# Altium PCB Sampler.PCBDOC (part 3 of 7)
Units mil, origin at the board's own origin, x right, y up, seen from the top; angles counter-clockwise.
Board outline 6299 x 3937 mil, 4 copper layers (Top, GP1(GND), L3, Bot), stack 64.883 mil thick; 567 components, 323 nets, 1698 pads, 817 vias.
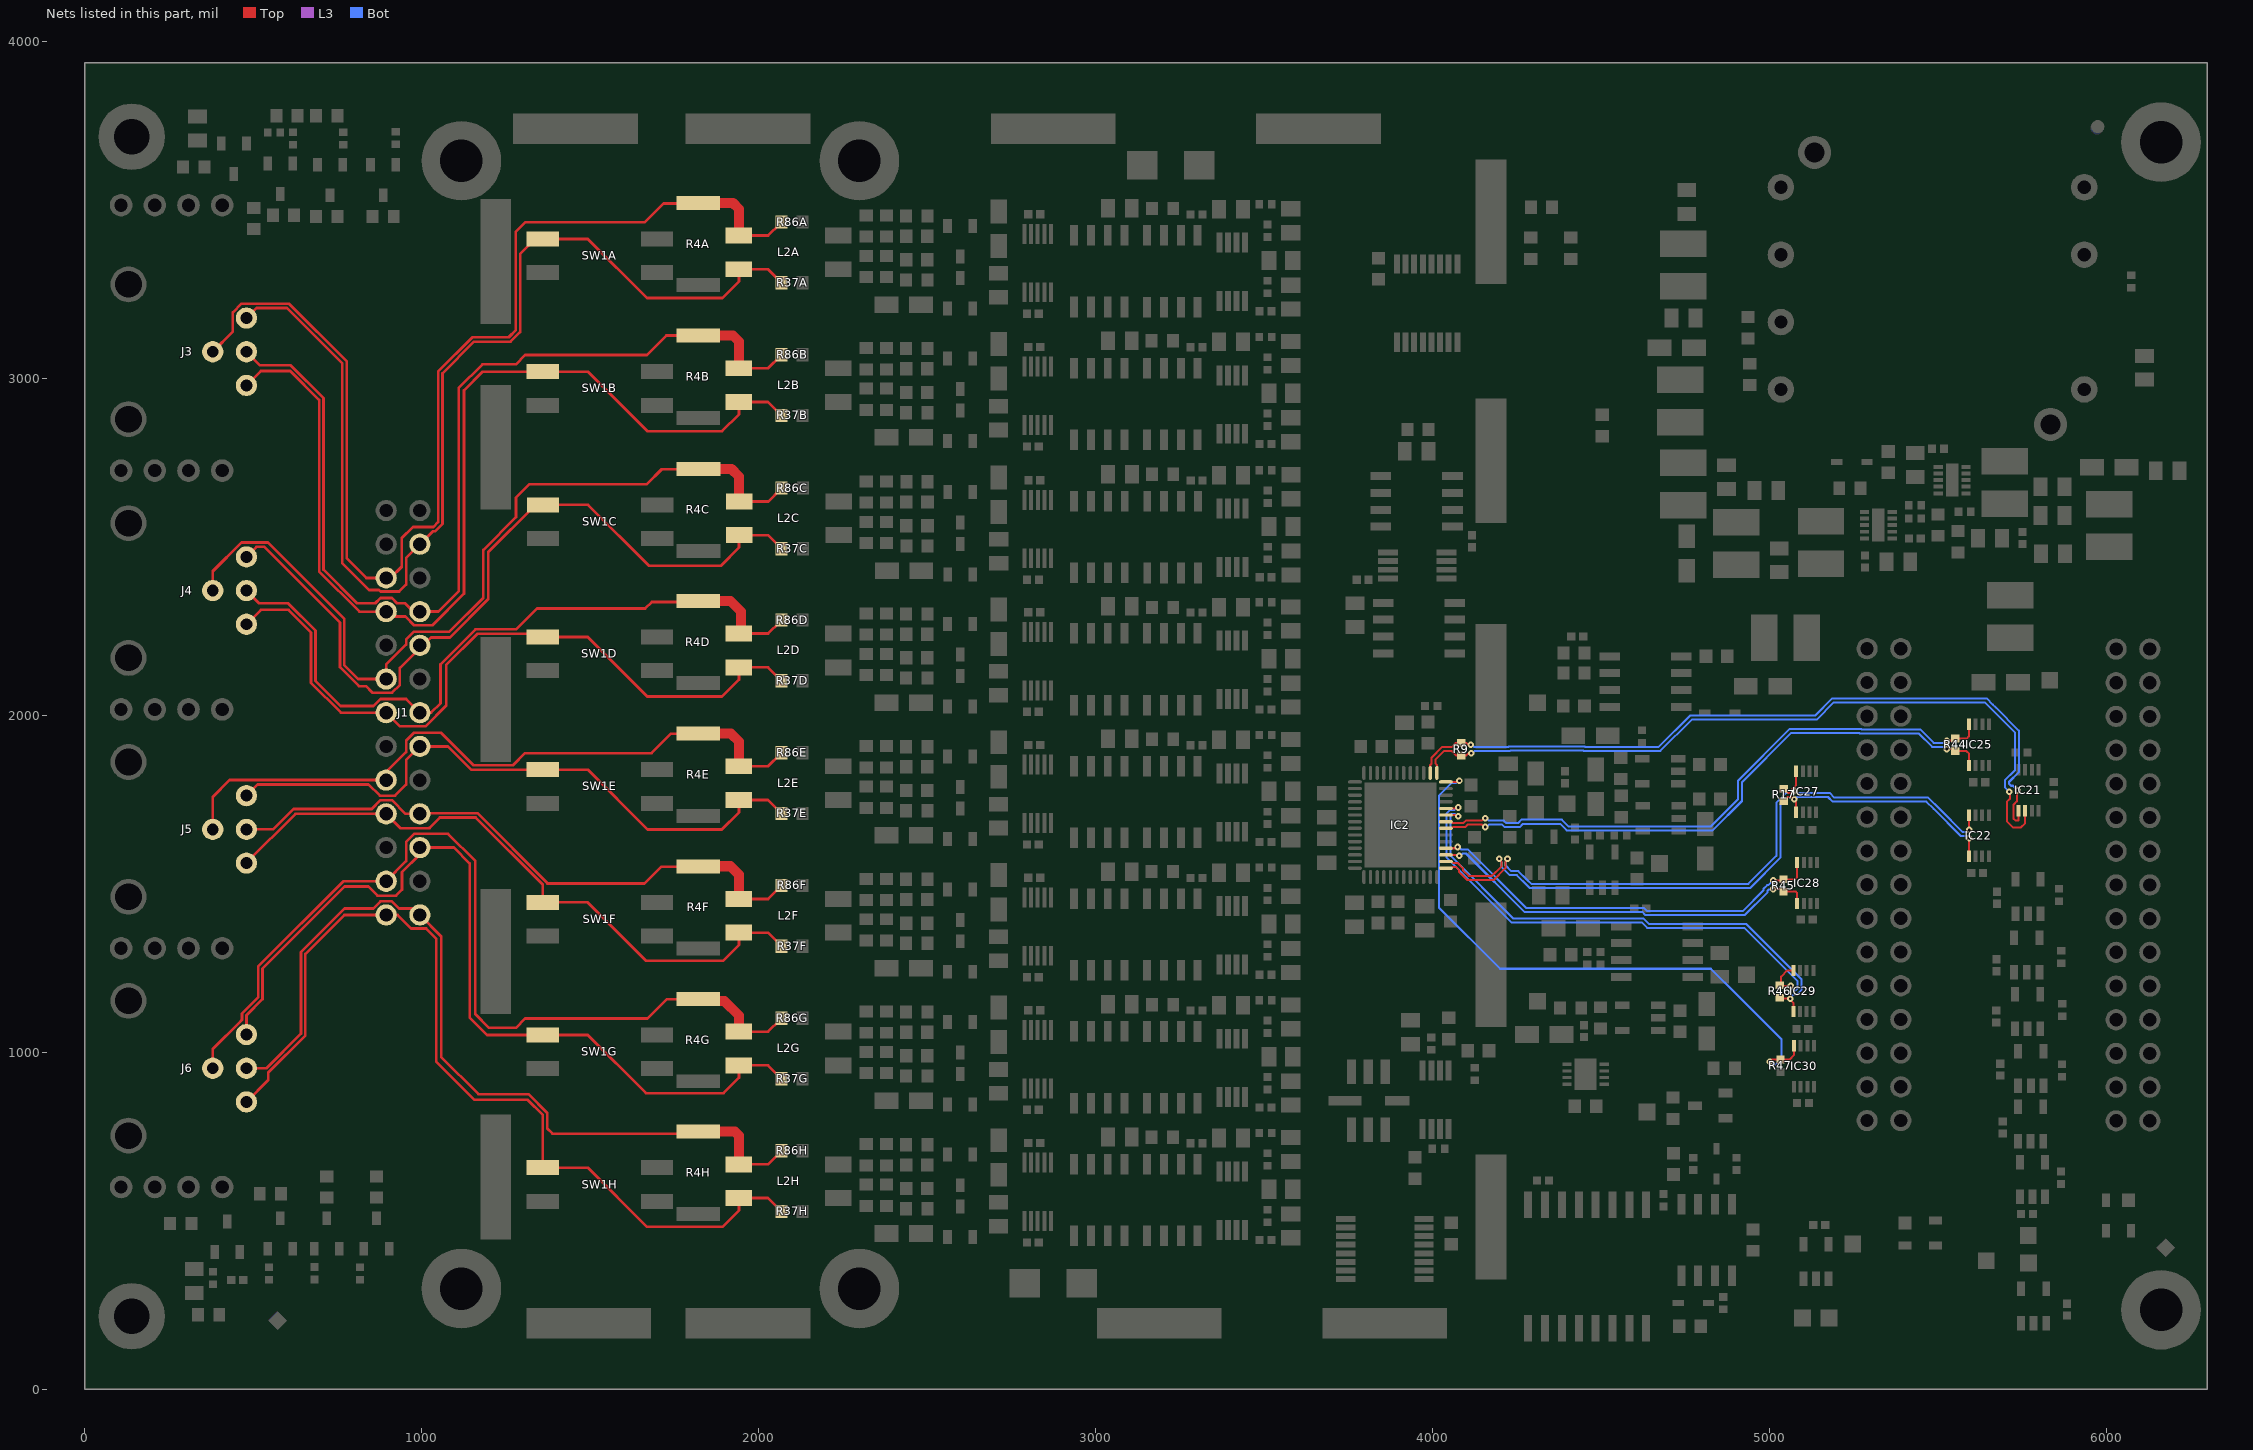
[diagram p4: the nets of this part, all layers, seen from the top]

## Part data (continued)
R19: library part R0603_36k_1%_0.1W_100PPM, "Resistor - 1%", Case=0603, Manufacturer=GENERIC, Manufacturer1 ComponentHeight=0.55mm, Manufacturer1 Example="NIC COMPONENT", Manufacturer1 Part Number=NRC06F3602TRF, Manufacturer Part Number=R0603_36K_1%_0.1W_100PPM, Power=0.1W, Tolerance=±1%, Author="CERN DEM JLC", Component Type=Standard, CreateDate=03.12.2007, HelpURL=\\cern.ch\dfs\Applications\Altium\Datasheets\R0603_NIC_NRC.pdf, LatestRevisionDate=13.03.2008, Mounted=Yes, Part Description="General Purpose Thick Film Chip Resistor", Part Number=R0603_36K_1%_0.1W_100PPM, Pin Count=2, PressFit=No, Sense=No, SMD=Yes, Socket=No, Status=Preferred, TC=±100ppm/°C
R20: library part R0603_270K_1%_0.1W_100PPM, "Resistor - 1%", Case=0603, Manufacturer=GENERIC, Manufacturer1 ComponentHeight=0.55mm, Manufacturer1 Example="NIC COMPONENT", Manufacturer1 Part Number=NRC06F2703TRF, Power=0.1W, Tolerance=±1%, Author="CERN DEM JLC", Component Type=Standard, CreateDate=03.12.2007, HelpURL=\\cern.ch\dfs\Applications\Altium\Datasheets\R0603_NIC_NRC.pdf, LatestRevisionDate=13.03.2008, Manufacturer Part Number=R0603_270K_1%_0.1W_100PPM, Mounted=Yes, Part Description="General Purpose Thick Film Chip Resistor", Part Number=R0603_270K_1%_0.1W_100PPM, Pin Count=2, Sense=No, SMD=Yes, Socket=No, Status=Preferred, TC=±100ppm/°C
R23 R50A R50B R50C R50D R50E R50F R50G R50H: library part R0402_2K4_1%_0.0625W_100PPM, "Resistor - 1%", Case=0402, Manufacturer=GENERIC, Manufacturer1 ComponentHeight=0.4mm, Manufacturer1 Example="YAGEO PHYCOMP", Manufacturer1 Part Number=232270672402L, Power=0.0625W, Tolerance=±1%, Author="CERN DEM JLC", Component Type=Standard, CreateDate=03.12.2007, HelpURL=\\cern.ch\dfs\Applications\Altium\Datasheets\R0402_Phycomp_RC0402.pdf, LatestRevisionDate=17.10.2012, Manufacturer Part Number=R0402_2K4_1%_0.0625W_100PPM, Mounted=Yes, Part Description="General Purpose Thick Film Chip Resistor", Part Number=R0402_2K4_1%_0.0625W_100PPM, Pin Count=2, PressFit=No, Sense=No, SMD=Yes, Socket=No, Status="Not Recommended", TC=±100ppm/°C
R24: library part R0402_33K_1%_0.0625W_100PPM, "Resistor - 1%", Case=0402, Manufacturer=GENERIC, Manufacturer1 ComponentHeight=0.4mm, Manufacturer1 Example="YAGEO PHYCOMP", Manufacturer1 Part Number=232270673303L, Power=0.0625W, Tolerance=±1%, Author="CERN DEM JLC", Component Type=Standard, CreateDate=03.12.2007, HelpURL=\\cern.ch\dfs\Applications\Altium\Datasheets\R0402_Phycomp_RC0402.pdf, LatestRevisionDate=17.10.2012, Manufacturer Part Number=R0402_33K_1%_0.0625W_100PPM, Mounted=Yes, Part Description="General Purpose Thick Film Chip Resistor", Part Number=R0402_33K_1%_0.0625W_100PPM, Pin Count=2, PressFit=No, Sense=No, SMD=Yes, Socket=No, Status="Not Recommended", TC=±100ppm/°C
R25 R48: library part R0402_62K_1%_0.0625W_100PPM, "Resistor - 1%", Case=0402, Manufacturer=GENERIC, Manufacturer1 ComponentHeight=0.4mm, Manufacturer1 Example="YAGEO PHYCOMP", Manufacturer1 Part Number=232270676203L, Power=0.0625W, Tolerance=±1%, Author="CERN DEM JLC", Component Type=Standard, CreateDate=03.12.2007, HelpURL=\\cern.ch\dfs\Applications\Altium\Datasheets\R0402_Phycomp_RC0402.pdf, LatestRevisionDate=17.10.2012, Manufacturer Part Number=R0402_62K_1%_0.0625W_100PPM, Mounted=Yes, Part Description="General Purpose Thick Film Chip Resistor", Part Number=R0402_62K_1%_0.0625W_100PPM, Pin Count=2, PressFit=No, Sense=No, SMD=Yes, Socket=No, Status="Not Recommended", TC=±100ppm/°C
R26 R32 R52 R56 R72 R73A R73B R73C R73D R73E R73F R73G R73H R142: library part R0603_24K_1%_0.1W_100PPM, "Resistor - 1%", Case=0603, Manufacturer=GENERIC, Manufacturer1 ComponentHeight=0.55mm, Manufacturer1 Example="NIC COMPONENT", Manufacturer1 Part Number=NRC06F2402TRF, Power=0.1W, Tolerance=±1%, Author="CERN DEM JLC", Component Type=Standard, CreateDate=03.12.2007, HelpURL=\\cern.ch\dfs\Applications\Altium\Datasheets\R0603_NIC_NRC.pdf, LatestRevisionDate=13.03.2008, Manufacturer Part Number=R0603_24K_1%_0.1W_100PPM, Mounted=Yes, Part Description="General Purpose Thick Film Chip Resistor", Part Number=R0603_24K_1%_0.1W_100PPM, Pin Count=2, Sense=No, SMD=Yes, Socket=No, Status=Preferred, TC=±100ppm/°C
  R72 R73A R73B R73C R73D R73E R73F R73G R73H: PressFit=No
R27 R28 R51 R57: library part R0402_5K1_1%_0.0625W_100PPM, "Resistor - 1%", Case=0402, Manufacturer=GENERIC, Manufacturer1 ComponentHeight=0.4mm, Manufacturer1 Example="YAGEO PHYCOMP", Manufacturer1 Part Number=232270675102L, Power=0.0625W, Tolerance=±1%, Author="CERN DEM JLC", Component Type=Standard, CreateDate=03.12.2007, HelpURL=\\cern.ch\dfs\Applications\Altium\Datasheets\R0402_Phycomp_RC0402.pdf, LatestRevisionDate=17.10.2012, Manufacturer Part Number=R0402_5K1_1%_0.0625W_100PPM, Mounted=Yes, Part Description="General Purpose Thick Film Chip Resistor", Part Number=R0402_5K1_1%_0.0625W_100PPM, Pin Count=2, PressFit=No, Sense=No, SMD=Yes, Socket=No, Status="Not Recommended", TC=±100ppm/°C
R29: library part R0402_20K_1%_0.0625W_100PPM, "Resistor - 1%", Case=0402, Manufacturer=GENERIC, Manufacturer1 ComponentHeight=0.4mm, Manufacturer1 Example="YAGEO PHYCOMP", Manufacturer1 Part Number=232270672003L, Power=0.0625W, Tolerance=±1%, Author="CERN DEM JLC", Component Type=Standard, CreateDate=03.12.2007, HelpURL=\\cern.ch\dfs\Applications\Altium\Datasheets\R0402_Phycomp_RC0402.pdf, LatestRevisionDate=17.10.2012, Manufacturer Part Number=R0402_20K_1%_0.0625W_100PPM, Mounted=Yes, Part Description="General Purpose Thick Film Chip Resistor", Part Number=R0402_20K_1%_0.0625W_100PPM, Pin Count=2, PressFit=No, Sense=No, SMD=Yes, Socket=No, Status="Not Recommended", TC=±100ppm/°C
R33A R33B R33C R33D R33E R33F R33G R33H R41A R41B R41C R41D R41E R41F R41G R41H R75 R76: library part R0603_0R_JUMPER, "Resistor", Case=0603, Manufacturer=GENERIC, Manufacturer1 ComponentHeight=0.55mm, Manufacturer1 Example="NIC COMPONENT", Manufacturer1 Part Number=NRC06Z0, Author="CERN DEM JLC", Component Type=Standard, CreateDate=03.12.2007, HelpURL=\\cern.ch\dfs\Applications\Altium\Datasheets\R0603_NIC_NRC.pdf, LatestRevisionDate=13.03.2008, Manufacturer Part Number=R0603_0R_JUMPER, Mounted=Yes, Part Description="1A (0.05R Max DC Resistance) Zero Ohm Jumper", Part Number=R0603_0R_JUMPER, Pin Count=2, Sense=No, SMD=Yes, Socket=No, Status=Preferred
  R75 R76: PressFit=No
R34A R34B R34C R34D R34E R34F R34G R34H R42A R42B R42C R42D R42E R42F R42G R42H: library part R0603_1K8_1%_0.1W_100PPM, "Resistor - 1%", Case=0603, Manufacturer=GENERIC, Manufacturer1 ComponentHeight=0.55mm, Manufacturer1 Example="NIC COMPONENT", Manufacturer1 Part Number=NRC06F1801TRF, Power=0.1W, Tolerance=±1%, Author="CERN DEM JLC", Component Type=Standard, CreateDate=03.12.2007, HelpURL=\\cern.ch\dfs\Applications\Altium\Datasheets\R0603_NIC_NRC.pdf, LatestRevisionDate=13.03.2008, Manufacturer Part Number=R0603_1K8_1%_0.1W_100PPM, Mounted=Yes, Part Description="General Purpose Thick Film Chip Resistor", Part Number=R0603_1K8_1%_0.1W_100PPM, Pin Count=2, Sense=No, SMD=Yes, Socket=No, Status=Preferred, TC=±100ppm/°C
R35A R35B R35C R35D R35E R35F R35G R35H R43A R43B R43C R43D R43E R43F R43G R43H: library part R0603_100K_1%_0.1W_100PPM, "Resistor - 1%", Case=0603, Manufacturer=GENERIC, Manufacturer1 ComponentHeight=0.55mm, Manufacturer1 Example="NIC COMPONENT", Manufacturer1 Part Number=NRC06F1003TRF, Power=0.1W, Tolerance=±1%, Author="CERN DEM JLC", Component Type=Standard, CreateDate=03.12.2007, HelpURL=\\cern.ch\dfs\Applications\Altium\Datasheets\R0603_NIC_NRC.pdf, LatestRevisionDate=13.03.2008, Manufacturer Part Number=R0603_100K_1%_0.1W_100PPM, Mounted=Yes, Part Description="General Purpose Thick Film Chip Resistor", Part Number=R0603_100K_1%_0.1W_100PPM, Pin Count=2, Sense=No, SMD=Yes, Socket=No, Status=Preferred, TC=±100ppm/°C
R53: library part R0402_51K_1%_0.0625W_100PPM, "Resistor - 1%", Case=0402, Manufacturer=GENERIC, Manufacturer1 ComponentHeight=0.4mm, Manufacturer1 Example="YAGEO PHYCOMP", Manufacturer1 Part Number=232270675103L, Power=0.0625W, Tolerance=±1%, Author="CERN DEM JLC", Component Type=Standard, CreateDate=03.12.2007, HelpURL=\\cern.ch\dfs\Applications\Altium\Datasheets\R0402_Phycomp_RC0402.pdf, LatestRevisionDate=17.10.2012, Manufacturer Part Number=R0402_51K_1%_0.0625W_100PPM, Mounted=Yes, Part Description="General Purpose Thick Film Chip Resistor", Part Number=R0402_51K_1%_0.0625W_100PPM, Pin Count=2, PressFit=No, Sense=No, SMD=Yes, Socket=No, Status="Not Recommended", TC=±100ppm/°C
R54: library part R0402_47K_1%_0.0625W_100PPM, "Resistor - 1%", Case=0402, Manufacturer=GENERIC, Manufacturer1 ComponentHeight=0.4mm, Manufacturer1 Example="YAGEO PHYCOMP", Manufacturer1 Part Number=232270674703L, Power=0.0625W, Tolerance=±1%, Author="CERN DEM JLC", Component Type=Standard, CreateDate=03.12.2007, HelpURL=\\cern.ch\dfs\Applications\Altium\Datasheets\R0402_Phycomp_RC0402.pdf, LatestRevisionDate=17.10.2012, Manufacturer Part Number=R0402_47K_1%_0.0625W_100PPM, Mounted=Yes, Part Description="General Purpose Thick Film Chip Resistor", Part Number=R0402_47K_1%_0.0625W_100PPM, Pin Count=2, PressFit=No, Sense=No, SMD=Yes, Socket=No, Status="Not Recommended", TC=±100ppm/°C
R58 R59 R60 R61 R62 R63 R64 R65 R66 R67: library part R0603_220R_1%_0.1W_100PPM, "Resistor - 1%", Case=0603, Manufacturer=GENERIC, Manufacturer1 ComponentHeight=0.55mm, Manufacturer1 Example="NIC COMPONENT", Manufacturer1 Part Number=NRC06F2200TRF, Power=0.1W, Tolerance=±1%, Author="CERN DEM JLC", Component Type=Standard, CreateDate=03.12.2007, HelpURL=\\cern.ch\dfs\Applications\Altium\Datasheets\R0603_NIC_NRC.pdf, LatestRevisionDate=13.03.2008, Manufacturer Part Number=R0603_220R_1%_0.1W_100PPM, Mounted=Yes, Part Description="General Purpose Thick Film Chip Resistor", Part Number=R0603_220R_1%_0.1W_100PPM, Pin Count=2, Sense=No, SMD=Yes, Socket=No, Status=Preferred, TC=±100ppm/°C
RN1A RN1B RN1C RN1D RN1E RN1F RN1G RN1H RN2A RN2B RN2C RN2D RN2E RN2F RN2G RN2H RN3 RN4: library part RN_10K_5K_VISHAY_AORN2-1AT3, "DIL8 Resistor Network 4 Resistors 10k-5k-5k-10k 0.1%", Case=SOIC8, Manufacturer="VISHAY DALE", Manufacturer Part Number=AORN2-1AT3, Power=4x0.1W, Tolerance=0.1%, Author="CERN DEM JLC", ComponentHeight=1.73mm, Component Type=Standard, CreateDate=20.02.2017, HelpURL=\\cern.ch\dfs\Applications\Altium\Datasheets\RN_VISHAY_AORN.pdf, LatestRevisionDate=20.02.2017, Mounted=Yes, Part Description="Dual-In-Line Thin Film Precision Automotive Resistors Network, (4 Isolated) - AORN Series", Part Number=RN_10K_5K_VISHAY_AORN2-1AT3, Pin Count=8, PressFit=No, Sense=No, SMD=Yes, Socket=No, TC=±25ppm/°C
SW1A SW1B SW1C SW1D SW1E SW1F SW1G SW1H: library part SW_CTS_204-121ST, "2x SPST DIP Switch 1NO + 1NF", Manufacturer=CTS, Manufacturer Part Number=204-121ST, Author="CERN DEM JLC", ComponentHeight=10.36mm, Component Type=Standard, CreateDate=28.08.2014, Family=Switch, HelpURL=\\cern.ch\dfs\Applications\Altium\Datasheets\SW_CTS_204-121ST.pdf, LatestRevisionDate=28.08.2014, Mounted=Yes, PackageDescription="Body 7.26 x 9.78mm, 2x SPST DIP, 1NO + 1NF Switch, CTS 204 Series", Part Description="Coupled SPST DIP Switch, 1NO + 1NF, CTS 204 Series", Part Number=SW_CTS_204-121ST, Pin Count=4, PressFit=No, Sense=No, SMD=Yes, Socket=No, Status=None
T1 T2 T3 T4 T5 T6 T7 T8 T9: "N-CHANNEL MOSFET WITH DIODE", Case=SOT23-3, Manufacturer="ON SEMICONDUCTOR", Author="CERN DEM JLC", Bonding=No, ComponentHeight=1.11mm, Component Type=Standard, CreateDate=23.03.2009, Device=BSS138LT1G, HelpURL=\\cern.ch\dfs\Applications\Altium\Datasheets\BSS138LT1G.pdf, LatestRevisionDate=23.03.2009, Manufacturer Part Number=BSS138LT1G, Mounted=Yes, PackageDescription="SOT23 3-Leads, Pitch 0.95mm - Body 1.4x3mm, IPC Medium Density", Part Description="50V 200mA N-Channel Enhancement Mode Field-Effect Transistor", Part Number=BSS138LT1G, Pin Count=3, PressFit=No, Sense=No, SMD=Yes, Socket=No
TP1 TP2 TP3 TP4 TP5 TP6 TP7 TP8 TP9 TP10 TP11 TP12 TP13: library part SMD_PAD_1.27X1.27MM, Author="CERN DEM JLC", ComponentHeight=0mm, Component Type="Standard (No BOM)", CreateDate=12.01.2008, Family="Test Point", HelpURL=Undefined, LatestRevisionDate=12.01.2008, Mounted=No, PackageDescription="1.27mm x 1.27mm PCB Copper Area (SMD Test Point)", Part Description="1.27mm x 1.27mm PCB Copper Area (SMD Test Point)", Part Number=SMD_PAD_1.27X1.27MM, Pin Count=1, Sense=No, SMD=Yes, Socket=No, Status=None
WASHER1 WASHER2 WASHER3 WASHER4 WASHER5 WASHER6 WASHER7 WASHER8: library part MECH_BNC_WASHER, "BNC Washer", Manufacturer=TE, Manufacturer Part Number=1-1634817-0, Part Number=TE_1-1634817-0, Author=GK, Component Type=Mechanical, ComponentHeight=0.5mm, CreateDate=27.04.2017, HelpURL=\\cern.ch\dfs\Applications\Altium\Datasheets\BOSSARD_BN83728-8243972.pdf, LatestRevisionDate=27.04.2017, Mounted=Yes, PackageDescription="BNC washer", Part Description="BNC washer", Pin Count=0, PressFit=No, Sense=No, SMD=No, Socket=No, Status=None

## Free pads (board coordinates)
  round 236.22 hole 125.98: 0(2299.21,299.21) 0(6161.42,236.22) 0(6161.42,3700.79) 1(2299.21,3645.67) 2(1118.11,3645.67) 3(1118.11,299.21)

## Via types
v1: diameter 19.68, hole 7.87, Top to Bot, tented both sides, 772 vias
v2: diameter 23.62, hole 11.81, Top to Bot, tented both sides, 17 vias
v3: diameter 19.68, hole 7.87, Top to Bot, 11 vias
v4: diameter 39.37, hole 23.62, Top to Bot, tented both sides, 7 vias
v5: diameter 23.62, hole 11.81, Top to Bot, 6 vias
v6: diameter 50, hole 28, Top to Bot, 4 vias

## Nets (pads, with @x,y where several pads share a name; then routed paths per layer and width w, separated by ;. In a path a pad name is that pad's centre, name@x,y a point inside that pad or via, vN(x,y) a via of type N, cw(c..) or ccw(c..) an arc to the next point about the centre after c; other vN are vias at no path point)
ADC_CLKOUT_N: IC2.34 IC25.8 R44.2 | length 1790.6
  Top w6: IC2.34@4039.17,1684.46 4055.96,1684.46 4059.8,1680.62 4091.42,1680.62 4098.5,1687.7 4146.14,1687.7 4152.98,1694.54 v1(4156.5,1694.54) ; v1(5525.64,1925) 5544.71,1925 R44.2@5550.87,1931.16 5584.68,1931.16 5590.98,1937.46 5590.98,1972.67 IC25.8@5591.81,1973.5
  Bot w6: v1(4156.5,1694.54) 4160.01,1694.54 4166.85,1687.7 4211.38,1687.7 4218.45,1680.62 4253.53,1680.62 4263.23,1690.32 4383.44,1690.32 4402.95,1670.81 4825.97,1670.81 4906.02,1750.87 4906.02,1806.45 5059.44,1959.87 5271.18,1959.87 5272.77,1958.29 5447.31,1958.29 5486.95,1918.65 5515.6,1918.65 5521.94,1925 v1(5525.64,1925)
ADC_CLKOUT_P: IC2.33 IC25.1 R44.1 | length 1790.6
  Top w6: IC2.33@4039.17,1664.78 4055.96,1664.78 4059.8,1668.62 4096.39,1668.62 4103.47,1675.7 4146.14,1675.7 4152.98,1668.86 v1(4156.5,1668.86) ; v1(5525.64,1900.31) 5544.71,1900.31 R44.1@5550.87,1894.15 5584.09,1894.15 5591.81,1886.43 IC25.1@5591.81,1851.46
  Bot w6: v1(4156.5,1668.86) 4160.01,1668.86 4166.85,1675.7 4206.41,1675.7 4213.48,1668.62 4258.5,1668.62 4268.2,1678.32 4378.47,1678.32 4397.98,1658.81 4830.94,1658.81 4918.02,1745.9 4918.02,1801.48 5064.41,1947.87 5266.21,1947.87 5267.8,1946.29 5442.34,1946.29 5481.97,1906.65 5515.6,1906.65 5521.94,1900.31 v1(5525.64,1900.31)
ADC_IN_N0: J1.23 J3.1 L2A.2 R37A.1 SW1A.1 | length 3319
  Top w8: J3.1@480.31,3178.98 509.99,3208.66 600.39,3208.66 765,3044.06 765,2451 844,2372 873.48,2372 878.1,2367.38 933.38,2367.38 954.38,2388.38 954.38,2467.38 J1.23@994.88,2507.87 1033.06,2546.06 1040.15,2546.06 1062.01,2567.91 1062.01,3015.08 1155.98,3109.05 1264.05,3109.05 1292.59,3137.59 1292.59,3369 1337.36,3413.77 SW1A.1@1359.92,3413.77 1493,3413.77 1668.58,3238.19 1892.64,3238.19 1941.57,3287.13 L2A.2@1941.57,3323.77 2027.72,3323.77 R37A.1@2067.72,3283.77
ADC_IN_N1: J1.20 J3.3 L2B.2 R37B.1 SW1B.1 | length 3027.8
  Top w8: J3.3@480.31,2978.98 522.98,3021.65 610.24,3021.65 696,2935.89 696,2427 815.13,2307.87 J1.20@894.88,2307.87 909.44,2293.31 952.17,2293.31 978.1,2267.38 1032.13,2267.38 1125.98,2361.23 1125.98,2964.57 1181.1,3019.68 1336.98,3019.68 1337.36,3020.07 SW1B.1@1359.92,3020.07 1493,3020.07 1669.57,2843.5 1891.65,2843.5 1941.57,2893.43 L2B.2@1941.57,2930.07 2027.72,2930.07 R37B.1@2067.72,2890.07
ADC_IN_N2: J1.17 J4.1 L2C.2 R37C.1 SW1C.1 | length 2345.9
  Top w8: J4.1@480.31,2470.32 509.99,2500 533.41,2500 757.87,2275.54 757.87,2143.15 814.41,2086.61 834.39,2086.61 853.62,2067.38 912.38,2067.38 935.37,2090.37 935.37,2140.5 J1.17@994.88,2200 ; J1.17@994.88,2207.87 1005.12,2207.87 1028.54,2231.3 1083.66,2231.3 1197.83,2345.47 1197.83,2484.62 1337.85,2624.64 SW1C.1@1360.42,2624.64 1493.49,2624.64 1674.24,2443.9 1887.97,2443.9 1942.07,2498 L2C.2@1942.07,2534.65 2028.21,2534.65 R37C.1@2068.21,2494.65
ADC_IN_N3: J1.14 J4.3 L2D.2 R37D.1 SW1D.1 | length 2171.5
  Top w8: J4.3@480.31,2270.32 522.98,2312.99 605.01,2312.99 672,2246 672,2096.38 760.51,2007.87 J1.14@894.88,2007.87 935.37,1967.38 1011.65,1967.38 1072.83,2028.56 1072.83,2149.61 1165.35,2242.13 1327.9,2242.13 1337.36,2232.67 SW1D.1@1359.92,2232.67 1493,2232.67 1669.57,2056.1 1891.65,2056.1 1941.57,2106.02 L2D.2@1941.57,2142.67 2027.72,2142.67 R37D.1@2067.72,2102.67
ADC_IN_N4: J1.11 J5.1 L2E.2 R37E.1 SW1E.1 | length 1894.7
  Top w8: J5.1@480.31,1761.66 513.65,1795 842.66,1795 876,1761.66 921.66,1761.66 954.38,1794.38 954.38,1867.38 J1.11@994.88,1907.87 1078.35,1907.87 1147.26,1838.96 SW1E.1@1359.92,1838.96 1493,1838.97 1670.55,1661.42 1890.67,1661.42 1941.57,1712.32 L2E.2@1941.57,1748.97 2027.72,1748.97 R37E.1@2067.72,1708.97
ADC_IN_N5: J1.8 J5.3 L2F.2 R37F.1 SW1F.1 | length 1959.8
  Top w8: J5.3@480.31,1561.66 480.31,1562.99 625.2,1707.87 J1.8@894.88,1707.87 937.75,1665 1023.62,1665 1023.62,1666.34 1054.13,1696.85 1160.43,1696.85 1359.92,1497.36 SW1F.1@1359.92,1445.27 1493,1445.27 1666.62,1271.65 1894.61,1271.65 1941.57,1318.62 L2F.2@1941.57,1355.27 2027.72,1355.27 R37F.1@2067.72,1315.27
ADC_IN_N6: J1.5 J6.1 L2G.2 R37G.1 SW1G.1 | length 2591
  Top w8: J6.1@480.31,1053 480.31,1110.23 528,1157.92 528,1249 771,1492 842,1492 869,1465 924,1465 942,1483 942,1535 J1.5@994.88,1587.88 ; J1.5@994.88,1607.87 1095.87,1607.87 1142.72,1561.02 1142.72,1103.35 1194.5,1051.57 SW1G.1@1359.92,1051.57 1493,1051.57 1665.63,878.94 1895.59,878.94 1941.57,924.92 L2G.2@1941.57,961.57 2027.72,961.57 R37G.1@2067.72,921.57
ADC_IN_N7: J1.2 J6.3 L2H.2 R37H.1 SW1H.1 | length 2734.5
  Top w8: J6.3@480.31,853 545,917.69 545,940 655,1050 655,1292 770.87,1407.87 J1.2@894.88,1407.87 928.87,1407.87 969.06,1367.68 977.8,1367.68 978.1,1367.38 1013.53,1367.38 1043.31,1337.6 1043.31,972.44 1156.5,859.25 1314.96,859.25 1359.92,814.29 SW1H.1@1359.92,657.86 1493,657.86 1668.58,482.28 1892.64,482.28 1941.57,531.22 L2H.2@1941.57,567.87 2027.72,567.87 R37H.1@2067.72,527.87
ADC_IN_P0: J1.22 J3.4 L2A.1 R4A.2 R86A.1 | length 3505.6
  Top w8: J3.4@380.31,3078.98 439.82,3138.49 439.82,3195.76 465.72,3221.66 605.78,3221.66 778,3049.44 778,2466 836.13,2407.87 J1.22@894.88,2407.87 908,2407.87 941.07,2440.94 941.07,2525.72 974.41,2559.06 1034.76,2559.06 1049.01,2573.3 1049.01,3020.46 1150.59,3122.05 1258.66,3122.05 1279.59,3142.98 1279.59,3435.14 1307.28,3462.83 1661.65,3462.83 1717.84,3519.02 1819.21,3519.02 R4A.2@1820.87,3520.67 ; L2A.1@1941.57,3423.77 2028.22,3423.77 2063.11,3458.66 2063.11,3459.17 R86A.1@2067.72,3463.77
  Top w30: R4A.2@1820.87,3520.67 1923.23,3520.67 1941.57,3502.32 L2A.1@1941.57,3423.77
ADC_IN_P1: J1.19 J3.2 L2B.1 R4B.2 R86B.1 | length 3016.5
  Top w8: J3.2@480.31,3078.98 520.81,3038.49 611.79,3038.49 709,2941.27 709,2432.38 808.71,2332.68 862.41,2332.68 878.1,2348.37 911.65,2348.37 927.34,2332.68 950.32,2332.68 974.93,2308.07 1050.2,2308.07 1109.98,2367.86 1109.98,2971.19 1180.23,3041.44 1279.59,3041.44 1307.28,3069.13 1668.54,3069.13 1726.38,3126.97 1814.96,3126.97 1817.91,3124.02 R4B.2@1820.87,3126.97 ; L2B.1@1941.57,3030.07 2028.22,3030.07 2063.11,3064.96 2063.11,3065.47 R86B.1@2067.72,3070.07
  Top w30: R4B.2@1820.87,3126.97 1924.21,3126.97 1941.57,3109.61 L2B.1@1941.57,3030.07
ADC_IN_P2: J1.16 J4.4 L2C.1 R4C.2 R86C.1 | length 2538.6
  Top w8: J4.4@380.31,2370.32 380.31,2427.59 465.72,2513 544,2513 770.87,2286.13 770.87,2148.53 811.54,2107.87 J1.16@894.88,2107.87 894.88,2150.6 954.38,2210.11 954.38,2224.65 978.1,2248.37 1082.35,2248.37 1183.07,2349.09 1183.07,2491.14 1280.08,2588.16 1280.08,2646.02 1320.09,2686.02 1668.31,2686.02 1712.6,2730.32 1819.29,2730.32 1819.71,2729.89 R4C.2@1821.36,2731.55 ; L2C.1@1942.07,2634.65 2028.71,2634.65 2063.6,2669.54 2063.6,2670.04 R86C.1@2068.21,2674.65
  Top w30: R4C.2@1821.36,2731.55 1919.04,2731.55 1941.93,2708.66 1941.93,2634.79 L2C.1@1942.07,2634.65
ADC_IN_P3: J1.13 J4.2 L2D.1 R4D.2 R86D.1 | length 2151.8
  Top w8: J4.2@480.31,2370.32 517.96,2332.68 603.71,2332.68 685,2251.38 685,2101.77 759.21,2027.56 857.29,2027.56 878.1,2048.37 954.38,2048.37 J1.13@994.88,2007.87 1028.54,2007.87 1056.1,2035.43 1056.1,2151.26 1159.97,2255.13 1280.68,2255.13 1342.48,2316.93 1663.39,2316.93 1683.07,2336.61 1817.91,2336.61 R4D.2@1820.87,2339.57 ; L2D.1@1941.57,2242.67 2028.22,2242.67 2063.11,2277.56 2063.11,2278.06 R86D.1@2067.72,2282.67
  Top w30: R4D.2@1820.87,2339.57 1916.34,2339.57 1947.83,2308.07 1947.83,2248.93 L2D.1@1941.57,2242.67
ADC_IN_P4: J1.10 J5.4 L2E.1 R4E.2 R86E.1 | length 2076.7
  Top w8: J5.4@380.31,1661.66 380.31,1758.27 430.05,1808 894.75,1808 J1.10@894.88,1807.87 894.88,1831.6 954.38,1891.1 954.38,1924.65 978.1,1948.37 1057.54,1948.37 1153.94,1851.96 1271.22,1851.96 1307.28,1888.02 1682.32,1888.02 1740.16,1945.87 1817.56,1945.87 1819.21,1944.22 R4E.2@1820.87,1945.87 ; L2E.1@1941.57,1848.97 2028.22,1848.97 2063.11,1883.86 2063.11,1884.36 R86E.1@2067.72,1888.97
  Top w30: R4E.2@1820.87,1945.87 1918.31,1945.87 1941.57,1922.6 L2E.1@1941.57,1848.97
ADC_IN_P5: J1.7 J5.2 L2F.1 R4F.2 R86F.1 | length 1848.5
  Top w8: J5.2@480.31,1661.66 559.3,1661.66 620.08,1722.44 852.18,1722.44 878.1,1748.37 911.65,1748.37 952.15,1707.87 J1.7@994.88,1707.87 996.86,1709.85 1165.82,1709.85 1372.92,1502.75 1372.92,1501.09 1661.53,1501.09 1710.95,1550.51 1819.21,1550.51 R4F.2@1820.87,1552.17 ; L2F.1@1941.57,1455.27 2028.22,1455.27 2063.11,1490.16 2063.11,1490.66 R86F.1@2067.72,1495.27
  Top w30: R4F.2@1820.87,1552.17 1916.34,1552.17 1941.57,1526.93 L2F.1@1941.57,1455.27
ADC_IN_P6: J1.4 J6.4 L2G.1 R4G.2 R86G.1 | length 2732.8
  Top w8: J6.4@380.31,953 380.31,1010.27 463.54,1093.5 467.31,1097.23 467.31,1115.62 515,1163.31 515,1255 767.87,1507.87 J1.4@894.88,1507.87 954.38,1567.38 954.38,1624.65 978.1,1648.37 1078.99,1648.37 1159.45,1567.91 1159.45,1113.19 1199.7,1072.94 1279.59,1072.94 1307.28,1100.62 1670.51,1100.62 1727.36,1157.48 1819.88,1157.48 R4G.2@1820.87,1158.47 ; L2G.1@1946.85,1061.57 2028.22,1061.57 2063.11,1096.46 2063.11,1096.96 R86G.1@2067.72,1101.57
  Top w30: R4G.2@1819.88,1152.07 1899,1152.07 1941.57,1109.49 1941.57,1066.84 1946.85,1061.57 L2G.1@1941.57,1061.57
ADC_IN_P7: J1.1 J6.2 L2H.1 R4H.2 R86H.1 | length 2536.4
  Top w8: J6.2@480.31,953 539.61,953 642,1055.39 642,1297.38 771.78,1427.17 856.9,1427.17 878.1,1448.37 911.65,1448.37 932.86,1427.17 J1.1@975.59,1427.17 ; J1.1@994.88,1407.87 1058.07,1344.68 1058.07,986.22 1168.31,875.98 1316.61,875.98 1372.92,819.67 1372.92,774.61 1388.67,758.86 R4H.2@1820.87,758.86 ; L2H.1@1941.57,667.87 2028.22,667.87 2063.11,702.76 2063.11,703.26 R86H.1@2067.72,707.87
  Top w30: R4H.2@1820.87,764.76 1930.12,764.76 1941.93,752.95 1941.93,668.22 L2H.1@1941.57,667.87
ADC_SCK_N: IC2.42 IC21.5 R9.1 | length 2250.3
  Top w6: IC2.42@3992.91,1829.15 3992.91,1852.82 3996.76,1856.66 3996.76,1874.47 4028.89,1906.61 4057.94,1906.61 4069.44,1918.11 R9.1@4084.65,1918.11 4099.85,1918.11 4105.01,1912.95 v1(4113.11,1912.95) ; v1(5735.73,1776.9) 5733.36,1774.53 5733.36,1745.19 5723.57,1735.41 5723.57,1693.88 5729.99,1687.46 5737.68,1687.46 5738.48,1688.26 IC21.5@5738.48,1716.7
  Bot w6: v1(4113.11,1912.95) 4116.81,1912.95 4123.24,1906.52 4224.99,1906.52 4225.83,1907.36 4451.9,1907.36 4452.74,1906.52 4670.93,1906.52 4763.97,1999.57 5134.99,1999.57 5185.81,2050.39 5643.75,2050.39 5662.03,2032.11 5670.51,2023.62 5739.36,1954.77 5739.36,1831.39 5710.18,1802.21 5710.18,1797.24 5716.25,1791.17 5721.46,1791.17 v1(5735.73,1776.9)
ADC_SCK_P: IC2.41 IC21.6 R9.2 | length 2269.1
  Top w6: IC2.41@4012.6,1829.15 4012.6,1852.82 4008.76,1856.66 4008.76,1869.5 4033.86,1894.61 4055.94,1894.61 4069.44,1881.1 R9.2@4084.65,1881.1 4099.85,1881.1 4106.01,1887.26 v1(4114.17,1887.26) ; v1(5711.3,1773.33) 5713.67,1770.96 5713.67,1753.34 5703.89,1743.56 5703.89,1685.72 5721.84,1667.77 5745.83,1667.77 5758.16,1680.1 IC21.6@5758.16,1716.7
  Bot w6: v1(4114.17,1887.26) 4117.27,1887.26 4124.53,1894.52 4229.96,1894.52 4230.8,1895.36 4446.93,1895.36 4447.77,1894.52 4675.9,1894.52 4768.94,1987.57 5139.96,1987.57 5190.78,2038.39 5638.78,2038.39 5727.36,1949.8 5727.36,1836.36 5698.18,1807.18 5698.18,1786.85 5711.3,1773.73 v1(5711.3,1773.33)
ADC_SDOA_N: IC2.28 IC22.1 IC27.1 R17.1 | length 2053.1
  Top w6: IC2.28@4039.17,1566.35 4055.96,1566.35 4059.8,1562.51 4073.81,1562.51 4089.84,1546.49 4089.84,1540.87 4107.09,1523.62 4176.23,1523.62 4203.74,1551.13 4203.74,1566.93 4197.4,1573.27 v1(4197.4,1574.76) ; R17.1@5040.86,1744.48 R17.1@5041.69,1745.31 5042.48,1745.31 5050.89,1753.73 5050.89,1754.3 5054.41,1757.81 5062.89,1757.81 5069.24,1751.47 v1(5072.57,1751.47) ; IC27.1@5078.64,1712.16 v1@5078.64,1745.63 ; IC22.1@5591.42,1581.91 5591.62,1582.11 5591.62,1635.01 v1(5591.81,1635.2)
  Bot w6: v1(4197.4,1574.76) 4197.4,1571.05 4203.74,1564.71 4203.74,1550.94 4228.73,1525.95 4249.6,1525.95 4280.13,1495.42 4287.73,1487.83 4941.85,1487.83 5032.08,1578.06 5032.08,1736.16 5045.2,1749.28 5053.73,1757.81 5062.53,1757.81 5068.87,1751.47 5076.28,1751.47 5082.62,1757.81 5173.1,1757.81 5186.82,1744.09 5465.29,1744.09 5486.95,1722.44 5567.84,1641.54 5588.3,1641.54 5591.81,1638.03 v1(5591.81,1635.2)
ADC_SDOA_P: IC2.27 IC22.8 IC27.8 R17.2 | length 2070.9
  Top w6: IC2.27@4039.17,1546.67 4055.96,1546.67 4059.8,1550.51 4068.84,1550.51 4077.84,1541.52 4077.84,1535.9 4087.16,1526.57 4102.12,1511.62 4181.2,1511.62 4215.74,1546.16 4215.74,1566.93 4222.08,1573.27 v1(4222.08,1574.76) ; R17.2@5043.1,1777.65 5043.1,1780.91 R17.2@5041.69,1782.32 5042.48,1782.32 5050.89,1773.9 5050.89,1773.33 5054.41,1769.81 5062.89,1769.81 5069.24,1776.15 v1(5072.57,1776.15) ; v1@5067.89,1782.32 5078.64,1793.07 IC27.8@5078.64,1834.21 ; IC22.8@5591.42,1703.96 5591.62,1703.76 5591.62,1660.08 v1(5591.81,1659.89)
  Bot w6: v1(4222.08,1574.76) 4222.08,1571.05 4215.74,1564.71 4215.74,1555.92 4233.7,1537.95 4254.57,1537.95 4281.02,1511.5 4292.7,1499.83 4936.88,1499.83 5020.08,1583.03 5020.08,1741.13 5033.2,1754.25 5048.76,1769.81 5062.53,1769.81 5068.87,1776.15 5076.28,1776.15 5082.62,1769.81 5178.07,1769.81 5191.79,1756.09 5470.26,1756.09 5503.92,1722.44 5572.81,1653.54 5588.3,1653.54 5591.81,1657.06 v1(5591.81,1659.89)
ADC_SDOB_N: IC2.30 IC28.8 R45.2 | length 1215.1
  Top w6: IC2.30@4039.17,1605.72 4075.74,1605.72 4074.02,1607.45 v1(4074.02,1609.33) ; v1(5010.34,1510.15) 5037.4,1510.15 R45.2@5040.9,1513.65 5075.07,1513.65 5081.66,1520.23 IC28.8@5081.66,1563.54
  Bot w6: v1(4074.02,1609.33) 4077.23,1609.33 4084.38,1602.18 4103.88,1602.18 4277.06,1429.01 4626.76,1429.01 4636.54,1419.24 4920.33,1419.24 4981.77,1480.68 4981.77,1485.32 4992.77,1496.31 4996.5,1496.31 v1(5010.34,1510.15)
ADC_SDOB_P: IC2.29 IC28.1 R45.1 | length 1200.7
  Top w6: IC2.29@4039.17,1586.04 4075.74,1586.04 v1(4078.74,1583.04) ; v1(5011.06,1484.74) 5032.8,1484.74 R45.1@5040.9,1476.64 5041.18,1476.93 5077.72,1476.93 5081.66,1472.99 IC28.1@5081.66,1441.49
  L3 w6: v1(4078.74,1583.04) v1@4078.74,1589.88
  Bot w6: v1(4078.74,1583.04) 4081.95,1583.04 4089.1,1590.18 4098.91,1590.18 4272.09,1417.01 4621.79,1417.01 4631.57,1407.24 4925.3,1407.24 4993.77,1475.71 4993.77,1480.35 4997.29,1483.86 5010.19,1483.86 v1(5011.06,1484.74)
ADC_SDOC_N: IC2.36 IC29.8 R46.2 | length 1558.8
  Top w5: R46.2@5030.08,1199.26 R46.2@5033.99,1199.26
  Top w6: IC2.36@4039.17,1723.83 4072.79,1723.83 v1(4075.79,1726.83) ; v1(5062.89,1196.79) 5036.47,1196.79 5033.99,1199.26 5033.99,1224.8 5052.35,1243.16 IC29.8@5070.41,1243.16
  Bot w6: v1(4075.79,1726.83) 4072.27,1726.83 4065.43,1719.99 4051.97,1719.99 4041.43,1709.45 4041.43,1578.15 4233.62,1385.95 4620.32,1385.95 4636.75,1369.53 4924.91,1369.53 5083.06,1211.38 5083.06,1190.3 5076.88,1184.13 5071.91,1184.13 5062.89,1193.15 v1(5062.89,1196.79)
ADC_SDOC_P: IC2.35 IC29.1 R46.1 | length 1530.9
  Top w6: IC2.35@4039.17,1704.15 4062.84,1704.15 4063.17,1704.48 4072.46,1704.48 v1(4075.79,1701.15) ; R46.1@5030.08,1162.26 5032.87,1159.47 v1(5061.57,1159.47) 5061.57,1155.77 5070.41,1146.93 IC29.1@5070.41,1121.11
  Bot w6: v1(4075.79,1701.15) 4072.27,1701.15 4065.43,1707.99 4056.94,1707.99 4053.43,1704.48 4053.43,1583.12 4238.59,1397.95 4625.29,1397.95 4641.72,1381.53 4929.88,1381.53 5095.06,1216.35 5095.06,1185.33 5081.85,1172.13 5071.91,1172.13 5061.57,1161.79 v1(5061.57,1159.47)
ADC_SDOD_N: IC2.40 IC30.8 R47.2 | length 1838.6
  Top w6: IC2.40@4039.17,1802.57 4076.53,1802.57 v1(4079.53,1805.57) ; v1@5003.33,975.54 5006.73,978.94 R47.2@5031.83,978.94 5059.15,978.94 5072.57,992.36 IC30.8@5072.57,1019.83
  Bot w6: v1(4079.53,1805.57) 4076.01,1805.57 4069.17,1798.73 4055.71,1798.73 4018.43,1761.45 4018.43,1429.99 4200.26,1248.16 4825.73,1248.16 4904.53,1169.36 5035.68,1038.2 5035.68,982.28 5025.43,972.03 5025.43,970.98 5018.36,963.91 5010.83,963.91 5002.07,972.68 v1(5000.47,972.68)